# Altium PCB Digital_output.PcbDoc
Units mm, origin at the board's own origin, x right, y up, seen from the top; angles counter-clockwise.
Board outline 32 x 30 mm, 2 copper layers (Top Layer, Bottom Layer); 17 components, 12 nets, 46 pads, 10 vias.
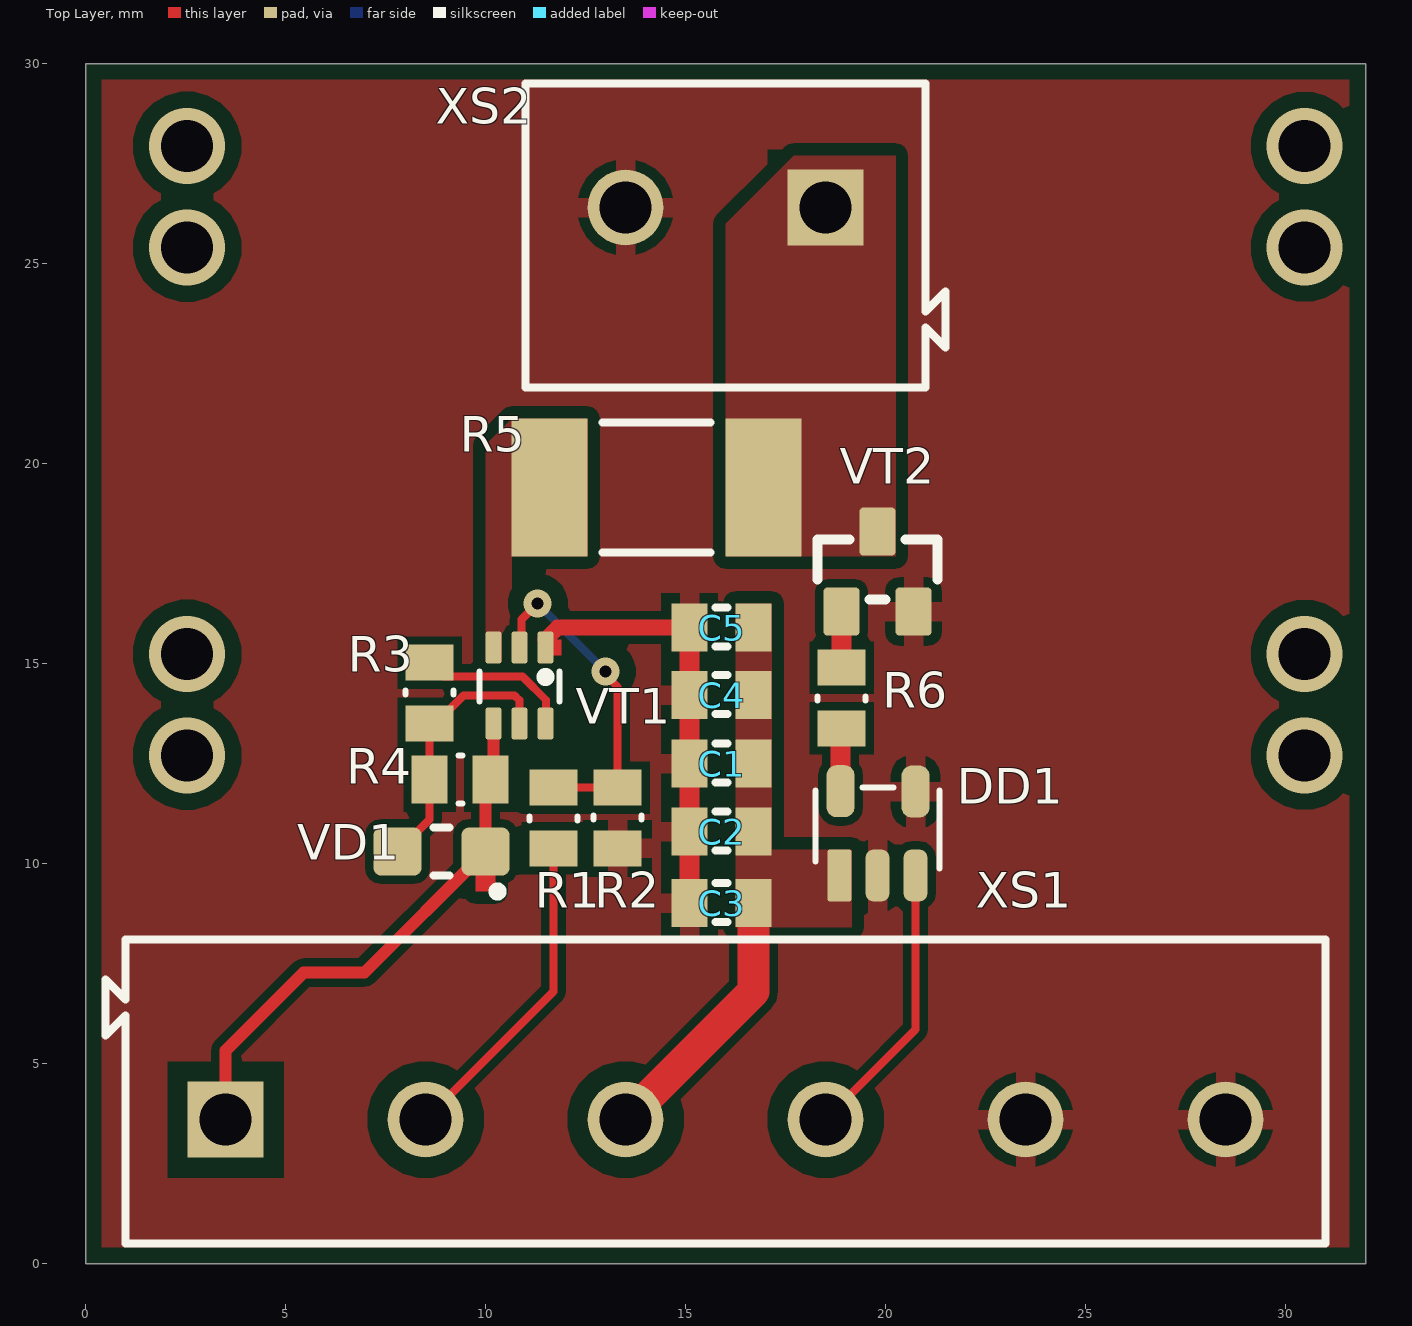
[diagram p0: Top Layer view]
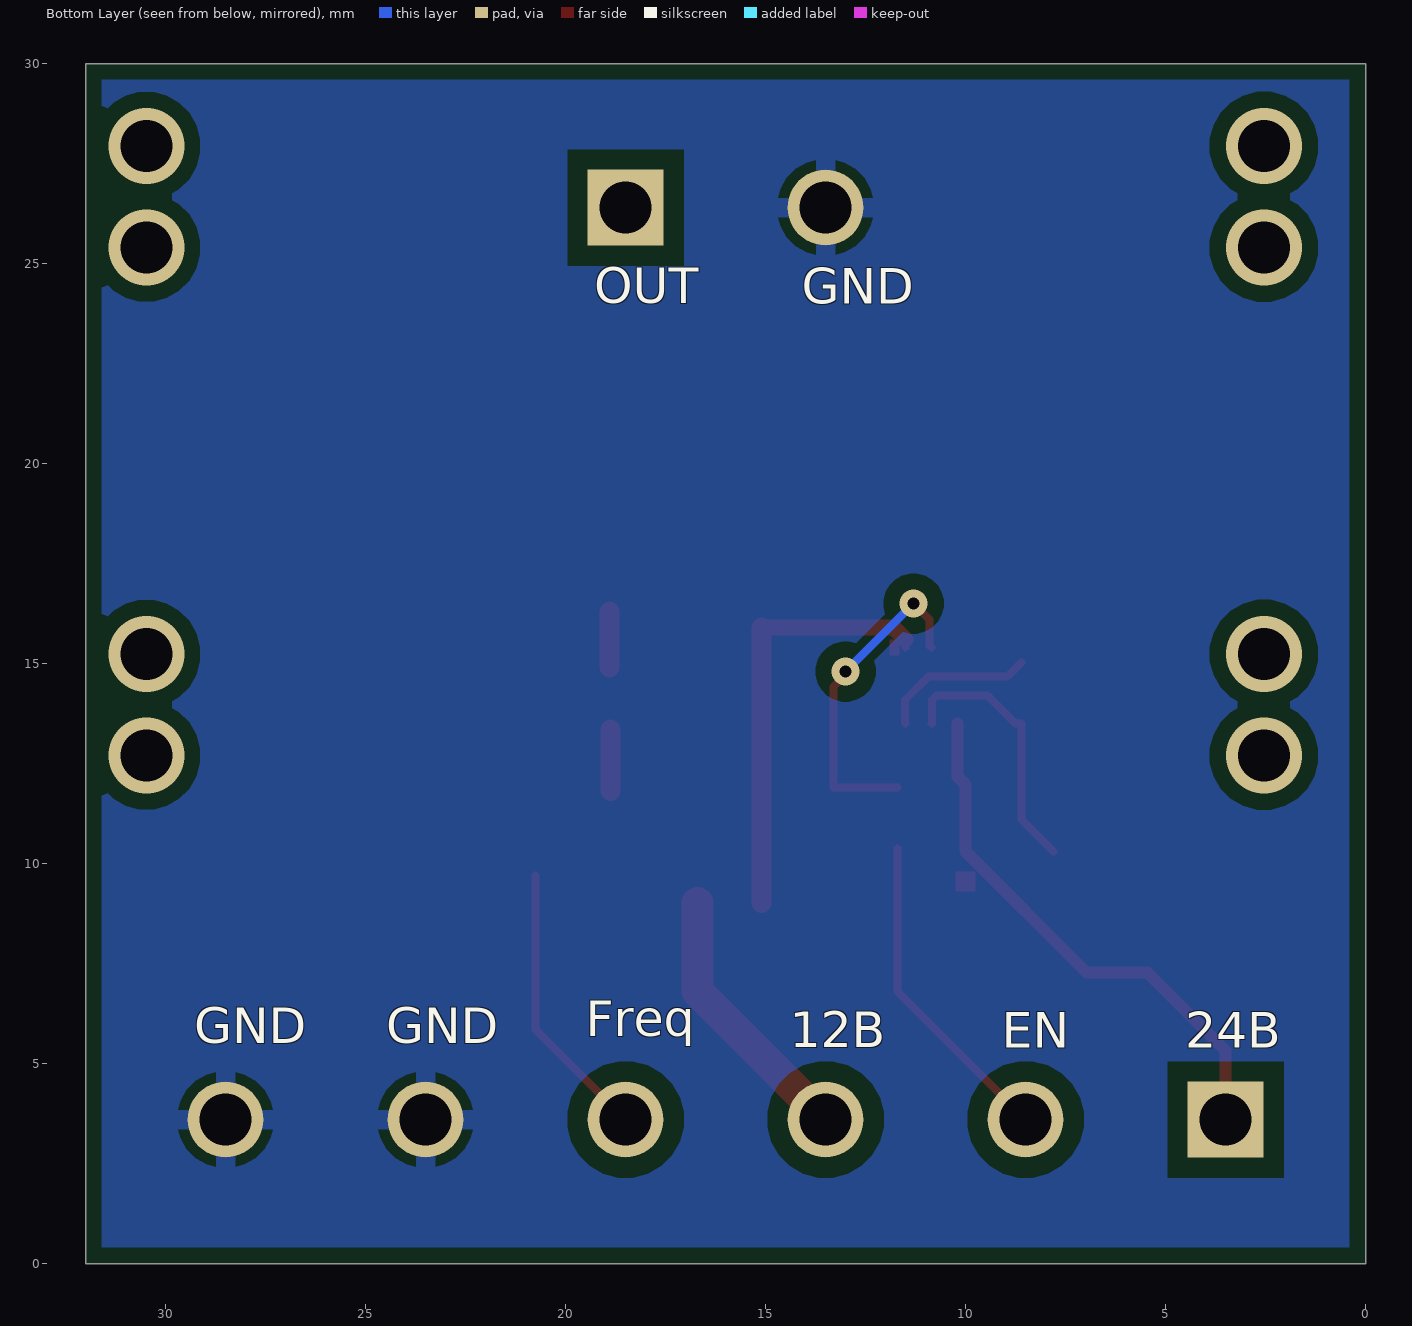
[diagram p1: Bottom Layer view, seen from below]
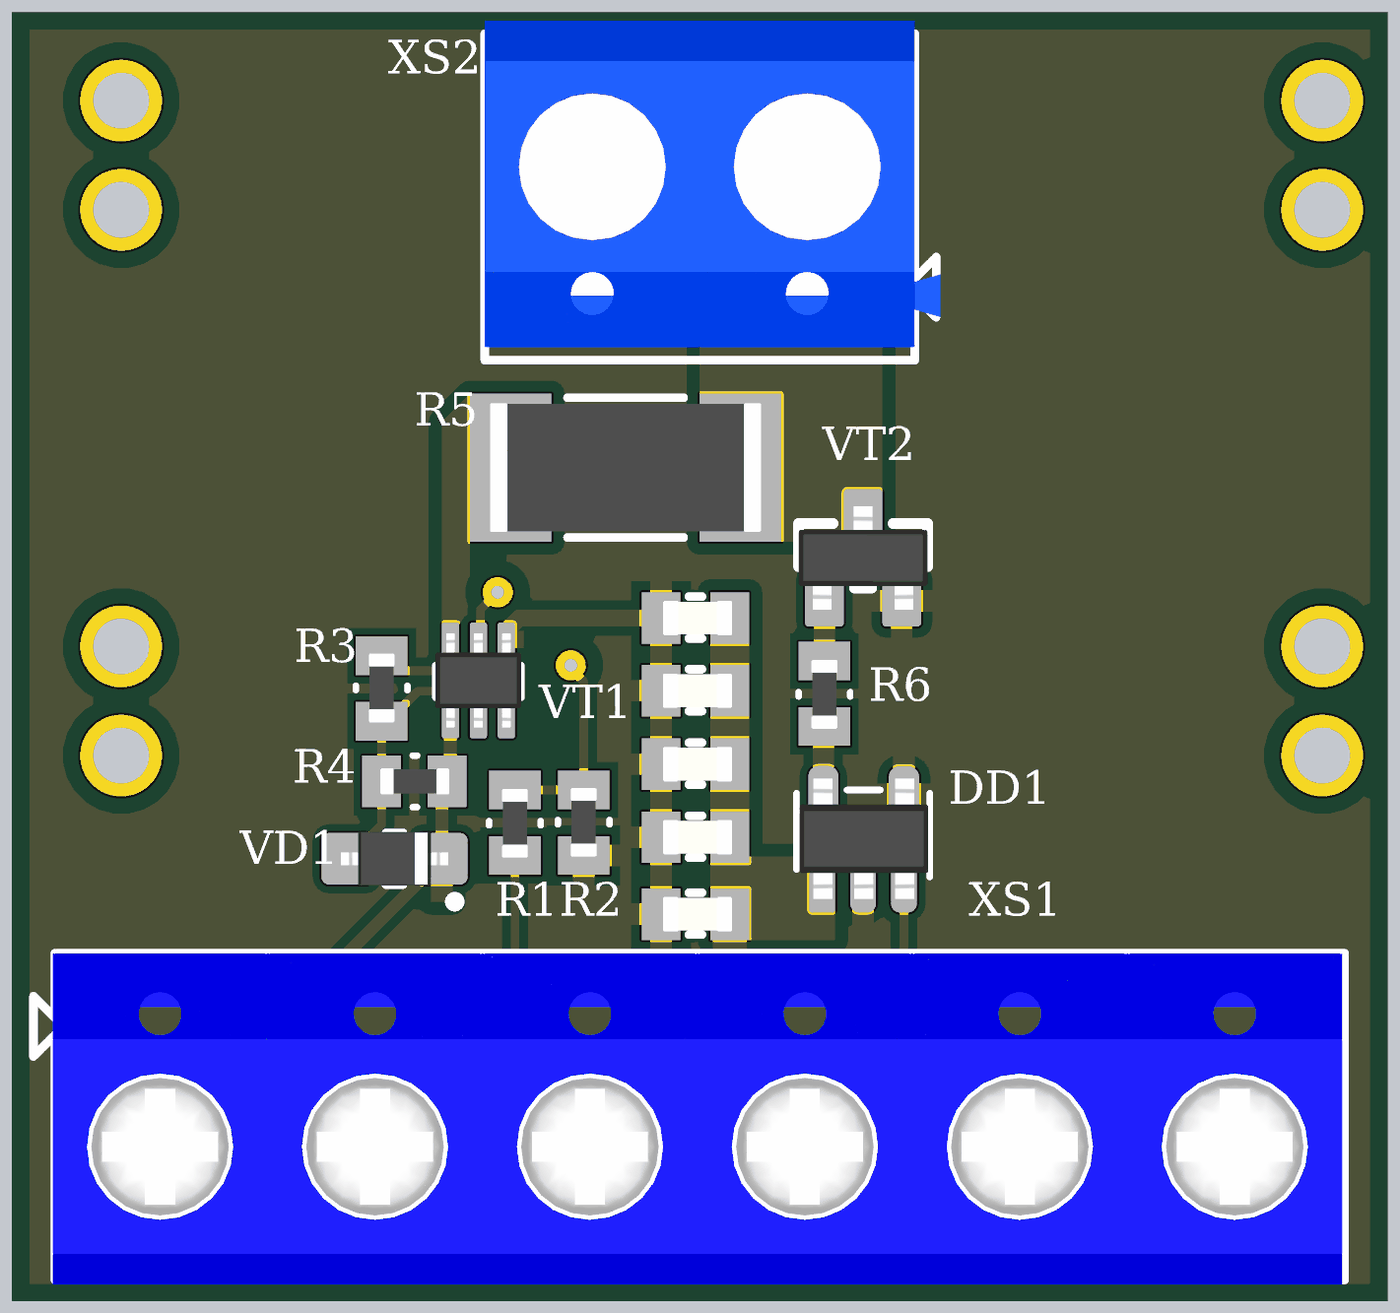
[diagram p2: 3D render of the assembled board from above, using the file's embedded part models]

## Layer stack, top to bottom
Top Solder: solder mask 0.0102, Solder Resist, Dk 3.5
Top Layer: signal copper 0.0356
Dielectric 1: dielectric 0.32, FR-4, Dk 4.8
Bottom Layer: signal copper 0.0356
Bottom Solder: solder mask 0.0102, Solder Resist, Dk 3.5

## Board outline
0,0 32,0 32,30 0,30

## Design rules (kind name [scope] priority, off if disabled: settings)
BoardOutlineClearance [All] p1: gap=0.4 ignorepadtopadclearanceinfootprint=FALSE except(0: Arc-SplitContinuation Track-SplitContinuation SMDPad-SplitContinuation THPad-SplitContinuation Via-SplitContinuation Fill-SplitContinuation Poly-SplitContinuation Region-SplitContinuation Text-SplitContinuation)
Clearance Clearance_Power [InNetClass('Power') vs InNetClass('Power')] p1: gap=0 ignorepadtopadclearanceinfootprint=FALSE except(0.1: Arc-Arc Arc-Track Track-Track SMDPad-SMDPad SMDPad-Fill SMDPad-Poly SMDPad-Region; 0.2: THPad-Fill THPad-Poly THPad-Region Via-Fill Via-Poly Via-Region; 0.254: Arc-Text Track-Text SMDPad-THPad SMDPad-Text THPad-THPad THPad-Via THPad-Text Via-Via Via-Text Fill-Text Poly-Text Region-Text Text-Text; 0.3: Fill-Fill Fill-Poly Fill-Region Poly-Poly Poly-Region Region-Region)
Clearance Clearance_1 [All] p2: gap=0.254 ignorepadtopadclearanceinfootprint=FALSE except(0: Arc-SMDPad Arc-THPad Arc-Via Arc-Hole Track-SMDPad Track-THPad Track-Via Track-Hole SMDPad-Via SMDPad-Hole THPad-Hole Via-Hole Fill-Hole Poly-Hole Region-Hole Text-Hole; 0.1: Arc-Arc Arc-Track Track-Track SMDPad-SMDPad; 0.2: Arc-Fill Arc-Poly Arc-Region Track-Fill Track-Poly Track-Region SMDPad-Fill SMDPad-Poly SMDPad-Region; 0.3: Fill-Fill Fill-Poly Fill-Region Poly-Poly Poly-Region Region-Region; 0.4: Via-Fill Via-Poly Via-Region; 0.5: THPad-Fill THPad-Poly THPad-Region)
DiffPairsRouting [All] p1: maxlimit=0.254 minlimit=0.254 mostfreqgap=0.254 toplayer_minwidth=0.1 toplayer_maxwidth=0.381 toplayer_prefwidth=0.2 bottomlayer_minwidth=0.1 bottomlayer_maxwidth=0.381 bottomlayer_prefwidth=0.2 maxuncoupledlength=12.7
Height [All] p1: minheight=0 maxheight=70 prefheight=35
HoleSize [All] p1: absolutevalues=TRUE maxlimit=2.54 minlimit=0.3 maxpercent=80.000 minpercent=20.000
HoleToHoleClearance [All] p1: gap=0.2 allowstackedmicrovias=TRUE
MinimumAnnularRing [All] p1: minimumring=0.2
MinimumSolderMaskSliver [All] p1: minsoldermaskwidth=0.2
PolygonConnect PolygonConnect_Power [InNetClass('Power')] p1: thpad.connectstyle=Direct thpad.reliefconductorwidth=0.254 thpad.reliefentries=4 thpad.polygonreliefangle="90 Angle" thpad.airgapwidth=0.254 smdpad.connectstyle=Direct smdpad.reliefconductorwidth=0.254 smdpad.reliefentries=4 smdpad.polygonreliefangle="90 Angle" smdpad.airgapwidth=0 via.connectstyle=Relief via.reliefconductorwidth=0.254 via.reliefentries=4 via.polygonreliefangle="90 Angle" via.airgapwidth=0
PolygonConnect [All] p2: connectstyle=Relief reliefconductorwidth=0.5 reliefentries=4 polygonreliefangle="90 Angle" airgapwidth=0.254
RoutingVias [All] p1: holewidth=1.2 width=2.5 viastyle="Through Hole" minholewidth=0.3 minwidth=0.5 maxholewidth=3 maxwidth=5
SolderMaskExpansion [All] p1: expansion=0.05 istentingtop=FALSE
SupplyNets "Schematic Supply Nets_2" [InNet('24В')] p1: voltage=0.000
SupplyNets "Schematic Supply Nets_1" [InNet('12В')] p2: voltage=0.000
SupplyNets "Schematic Supply Nets" [InNet('GND')] p3: voltage=0.000
Width [All] p1: maxlimit=2.5 minlimit=0.15 preferedwidth=0.2 checkconnectedcopper=TRUE
25 further rules are at their usual default settings.

## Classes and differential pairs
net class Power: 12В NetDD1_5 NetR5_2 NetR6_2 OUT

## Components (designator, comment, footprint, x,y, rotation, side; value= is the part's Value field where it differs from the comment)
C1 "1 мкФ" "CAP 0603 3D" 15.1,12.5 r90 top
C2 "1 мкФ" "CAP 0603 3D" 15.1,10.8 r90 top
C3 "1 мкФ" "CAP 0603 3D" 15.1,9.01 r90 top
C4 "1 мкФ" "CAP 0603 3D" 15.1,14.21 r90 top
C5 "1 мкФ" "CAP 0603 3D" 15.1,15.9 r90 top
DD1 "UCC27517" SOT-23-5 18.85,9.725 r90 top
R1 "200" "Res_0603 3D" 11.7,10.376 r180 top
R2 "3k" "Res_0603 3D" 13.3,11.9 r0 top
R3 "3k" "Res_0603 3D" 8.6,15.024 r0 top
R4 "3k" "Res_0603 3D" 10.124,12.1 r270 top
R5 "1k" "Res_2512 3D" 16.925,19.45 r270 top
R6 "100" "Res_0603 3D" 18.9,13.376 r180 top
VD1 "BZT52C10S" SOD-323 10,10.3 r270 top
VT1 "LBSS8402DW1T1G" SOT-363 11.521,15.375 r270 top
VT2 "SI2308BDS-T1-GE3" SOT-23-3 18.9,16.3 r0 top
XS1 "KF-301-6P" Degson_DG301-5.0-06P-1X 3.5,3.6 r0 top
XS2 "KF-301-2P" Degson_DG301-5.0-02P-1X 18.5,26.4 r180 top

## Footprints (in the part's own frame and the unit in brackets; to place one, negate y for a bottom-side part, rotate by r counter-clockwise, add the part's x,y. Pads: shape width x height; smd on the part's side, far side on the other; paste and mask are expansions set on the pad)
"CAP 0603 3D" [mm] "Конденсатор керамический ЧИП (SMD)"
  rect 1.2x0.9 smd: 1(0,0) 2(0,-1.6)
  silkscreen extent -0.48,-0.95 0.5,-0.65, body extent -0.4,-1.65 0.4,-0.05, height 0.86
Degson_DG301-5.0-02P-1X [mm]
  rect 1.9x1.9 hole 1.3 mask+0.102: 1(0,0)
  round 1.9 hole 1.3 mask+0.102: 2(5,0)
  silkscreen extent -3,-3.1 7.5,4.5, body extent -3.1,-3.4 7.5,4.2, height 10
Degson_DG301-5.0-06P-1X [mm]
  rect 1.9x1.9 hole 1.3 mask+0.102: 1(0,0)
  round 1.9 hole 1.3 mask+0.102: 2(5,0) 3(10,0) 4(15,0) 5(20,0) 6(25,0)
  silkscreen extent -3,-3.1 27.5,4.5, body extent -2.55,-3.2 27.45,4.5, height 10.25
"Res_0603 3D" [mm] "Резистор ЧИП (SMD)"
  rect 1.2x0.9 smd: 1(0,0) 2(0,-1.524)
  silkscreen extent -0.6,-0.8 0.6,-0.7, body extent -0.3,-1.55 0.3,0.05, height 0.63
"Res_2512 3D" [mm] "Резистор ЧИП (SMD)"
  rect 3.45x1.9 smd: 1(0.05,0.025) 2(0.05,-5.325)
  silkscreen extent -1.58,-4 1.67,-1.3, body extent -1.45,-5.8 1.55,0.5, height 0.7
SOD-323 [mm]
  rrect30% 1.2x1.2 smd: 1(0,0) 2(0,-2.2)
  Top Layer region: 0.5,-0.25 1,-0.25 1,0.25 0.5,0.25
  silkscreen extent -0.6,-1.3 1.1,0.4, body extent -0.62,-2.35 0.63,0.15, height 0.95
SOT-23-3 [mm] "TO-236AB    SuperSOT-3   SOT-346   KT-46   SC-59   SMT3"
  rrect20% 0.9x1.2 smd: 1(0,0) 2(0.9,2) 3(1.8,0)
  silkscreen extent -0.6,0.3 2.4,1.8, body extent -0.6,-0.2 2.4,2.2, height 1
SOT-23-5 [mm]
  rrect20% 1.3x0.6 smd: 1(-0.025,0)
  rrect70% 1.3x0.6 smd: 2(-0.025,-0.95) 3(-0.025,-1.9)
  rrect70% 1.3x0.7 smd: 4(2.075,-1.9) 5(2.083,-0.025)
  silkscreen extent 0.15,-2.5 2.17,0.6, body extent -0.36,-2.47 2.44,0.53, height 1
SOT-363 [mm] "SC70-6   UMT6"
  rrect30% 0.8x0.4 smd: 1(-0.025,-0.021) 2(-0.025,-0.671) 3(-0.025,-1.321) 4(1.875,-1.321) 5(1.875,-0.671) 6(1.875,-0.021)
  Top Layer region: -0.225,0.379 -0.225,0.129 0.175,0.129 0.175,0.379
  silkscreen extent 0.57,-1.67 1.32,0.33, body extent -0.18,-1.67 2.02,0.33, height 1

## Part data
C1 C2 C3 C4 C5: library part C, "Конденсатор керамика"
R1 R2 R3 R4 R5 R6: library part R, "Резисторы плёночные (SMD; МЛТ; С2-33Н; MP9xxx)"
VD1: library part "Стаб. х1 K-A", "Стабилитрон (ограничитель)"
VT2: library part "VT MOSFET-N", "Транзистор MOSFET N-канал"

## Via types
v1: diameter 1.9, hole 1.3, Top Layer to Bottom Layer, 8 vias
v2: diameter 0.7, hole 0.3, Top Layer to Bottom Layer, 2 vias

## Nets (pads, with @x,y where several pads share a name; then routed paths per layer and width w, separated by ;. In a path a pad name is that pad's centre, name@x,y a point inside that pad or via, vN(x,y) a via of type N, cw(c..) or ccw(c..) an arc to the next point about the centre after c; other vN are vias at no path point)
12В: C1.2 C2.2 C3.2 C4.2 C5.2 DD1.1 XS1.3 | length 6.7
  Top Layer w0.8: XS1.3 16.7,6.8 C3.2
24В: R4.1 VD1.1 VT1.4 XS1.1 | length 13.6
  Top Layer w0.3: XS1.1 3.5,5.32 5.45,7.27 6.97,7.27 VD1.1 10,11.976 R4.1 10.2,12.176 VT1.4
EN_1k: R1.1 XS1.2 | length 8.1
  Top Layer w0.2: XS1.2 11.7,6.8 R1.1
GND: C1.1 C2.1 C3.1 C4.1 C5.1 DD1.2 DD1.4 R2.2 VT1.1 VT2.3 XS1.5 XS1.6 XS2.2 | length 10.8
  Top Layer w0.2: VT1.1 VT1.1@11.5,15.6
  Top Layer w0.4: VT1.1@11.5,15.6 11.8,15.9 C5.1
  Top Layer w0.5: C3.1 C2.1 C5.1
IN: DD1.3 XS1.4 | length 7
  Top Layer w0.2: XS1.4 20.75,5.85 DD1.3
NetDD1_5: DD1.5 R6.1 | length 1.6
  Top Layer w0.3: R6.1@18.875,13.351 R6.1
  Top Layer w0.5: DD1.5 R6.1@18.875,13.351
NetR1_2: R1.2 R2.1 VT1.2 | length 8.3
  Top Layer w0.2: VT1.2 10.9,15.45 10.9,16.1 v2(11.3,16.5) ; R1.2 R2.1 13.3,14.419 13,14.719 v2(13,14.8)
  Bottom Layer w0.2: v2(11.3,16.5) v2(13,14.8)
NetR3_1: R3.1 VT1.6 | length 3.9
  Top Layer w0.2: R3.1 8.95,14.674 10.926,14.674 11.517,14.083 11.517,13.517 VT1.6
NetR3_2: R3.2 R4.2 VD1.2 VT1.5 | length 6.7
  Top Layer w0.2: VD1.2 8.6,11.1 R4.2 R3.2 8.75,13.5 9.45,14.2 10.727,14.2 10.844,14.083 10.844,13.506 VT1.5
NetR5_2: R5.2 VT1.3
NetR6_2: R6.2 VT2.1 | length 1.4
  Top Layer w0.5: R6.2 VT2.1
OUT: R5.1 VT2.2 XS2.1
copper on no net:
  other v1: 2.54,12.7 30.48,12.7 2.54,15.24 30.48,15.24 2.54,25.4 30.48,25.4 2.54,27.94 30.48,27.94

## Polygon pours and split planes (outlines as drawn)
GND on Top Layer "GND_L01_P015" (solid, remove dead copper, pour order 15): 0,30 32,30 32,0 0,0
NetR5_2 on Top Layer "NETR5_2_L01_P014" (solid, pour order 14): 12.55,17.68 10.65,17.68 10.65,16 10.4,15.75 10.4,15.05 10,15.05 10,20.47 10.65,21.12 12.55,21.12
12В on Top Layer "12В_L01_P013" (solid, pour order 13): 17.15,16.5 16.25,16.5 16.25,8.41 17.15,8.41 17.151,8.411 17.151,8.41 19.15,8.41 19.15,10.35 17.15,10.35
OUT on Top Layer "OUT_L01_P008" (solid, pour order 8): 16,17.68 20.25,17.68 20.25,27.7 17.7,27.7 16,26
GND on Bottom Layer "GND_L02_P017" (solid, remove dead copper, pour order 17): 0,0 0,30 32,30 32,0

## Silkscreen, mask and mechanical layers (free items; w line width, h text height)
Bottom Overlay:
  text "GND" at 14.1,23.7 h1.52
  text "OUT" at 19.28,23.71 h1.52
  text "Freq" at 19.5,5.388 h1.52
  text "GND" at 24.48,5.21 h1.52
  text "GND" at 29.28,5.21 h1.52
  text "24В" at 4.507,5.1 h1.52
  text "EN" at 9.1,5.1 h1.52
  text "12В" at 14.394,5.11 h1.52
Рамка:
  the board outline again, w0.254